# Altium PCB PCB1.PcbDoc
Units mm, origin at the board's own origin, x right, y up, seen from the top; angles counter-clockwise.
Board outline 89 x 74 mm, 2 copper layers (Top Layer, Bottom Layer); 48 components, 43 nets, 273 pads, 366 vias.
Unrouted connection lines stored in the file: 29.
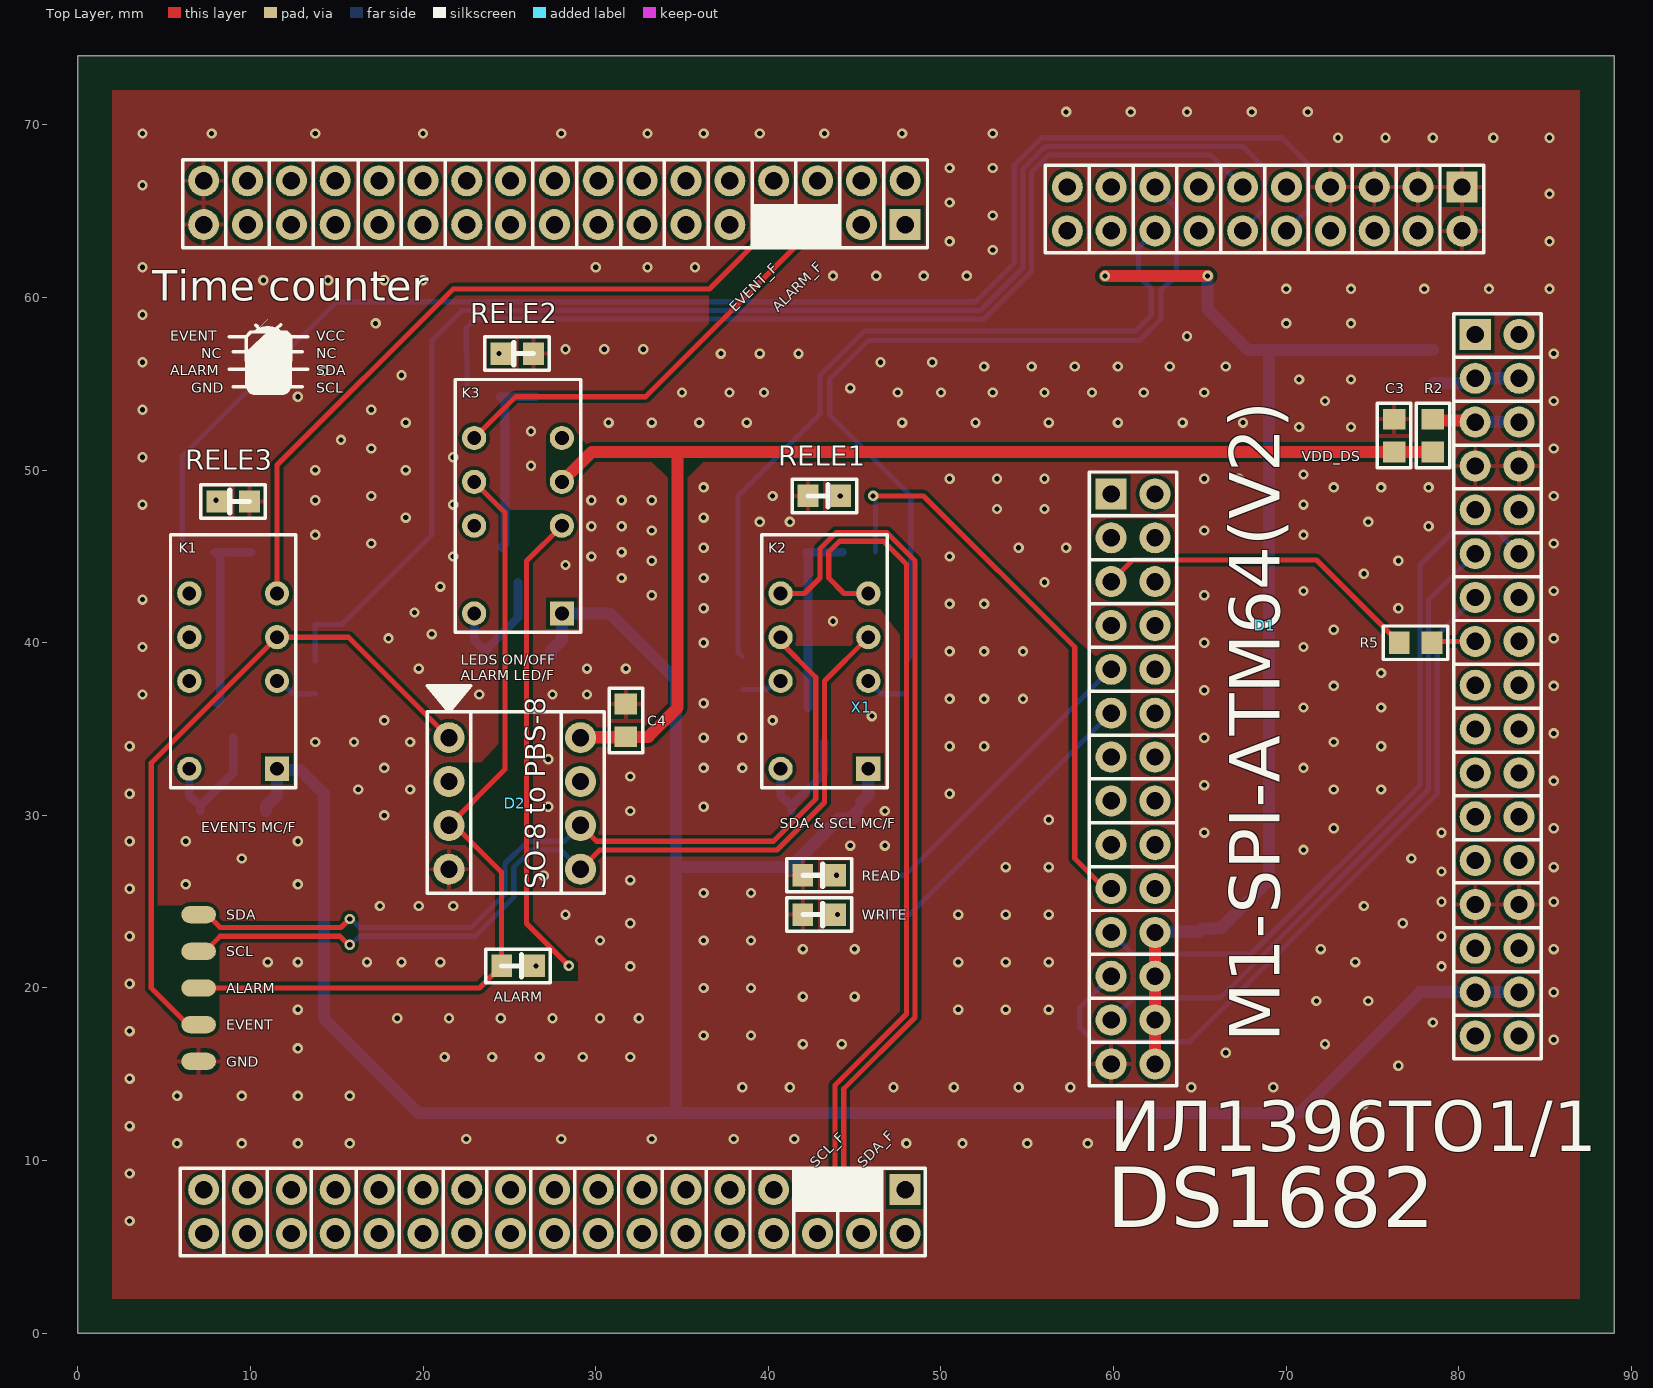
[diagram p0: Top Layer view]
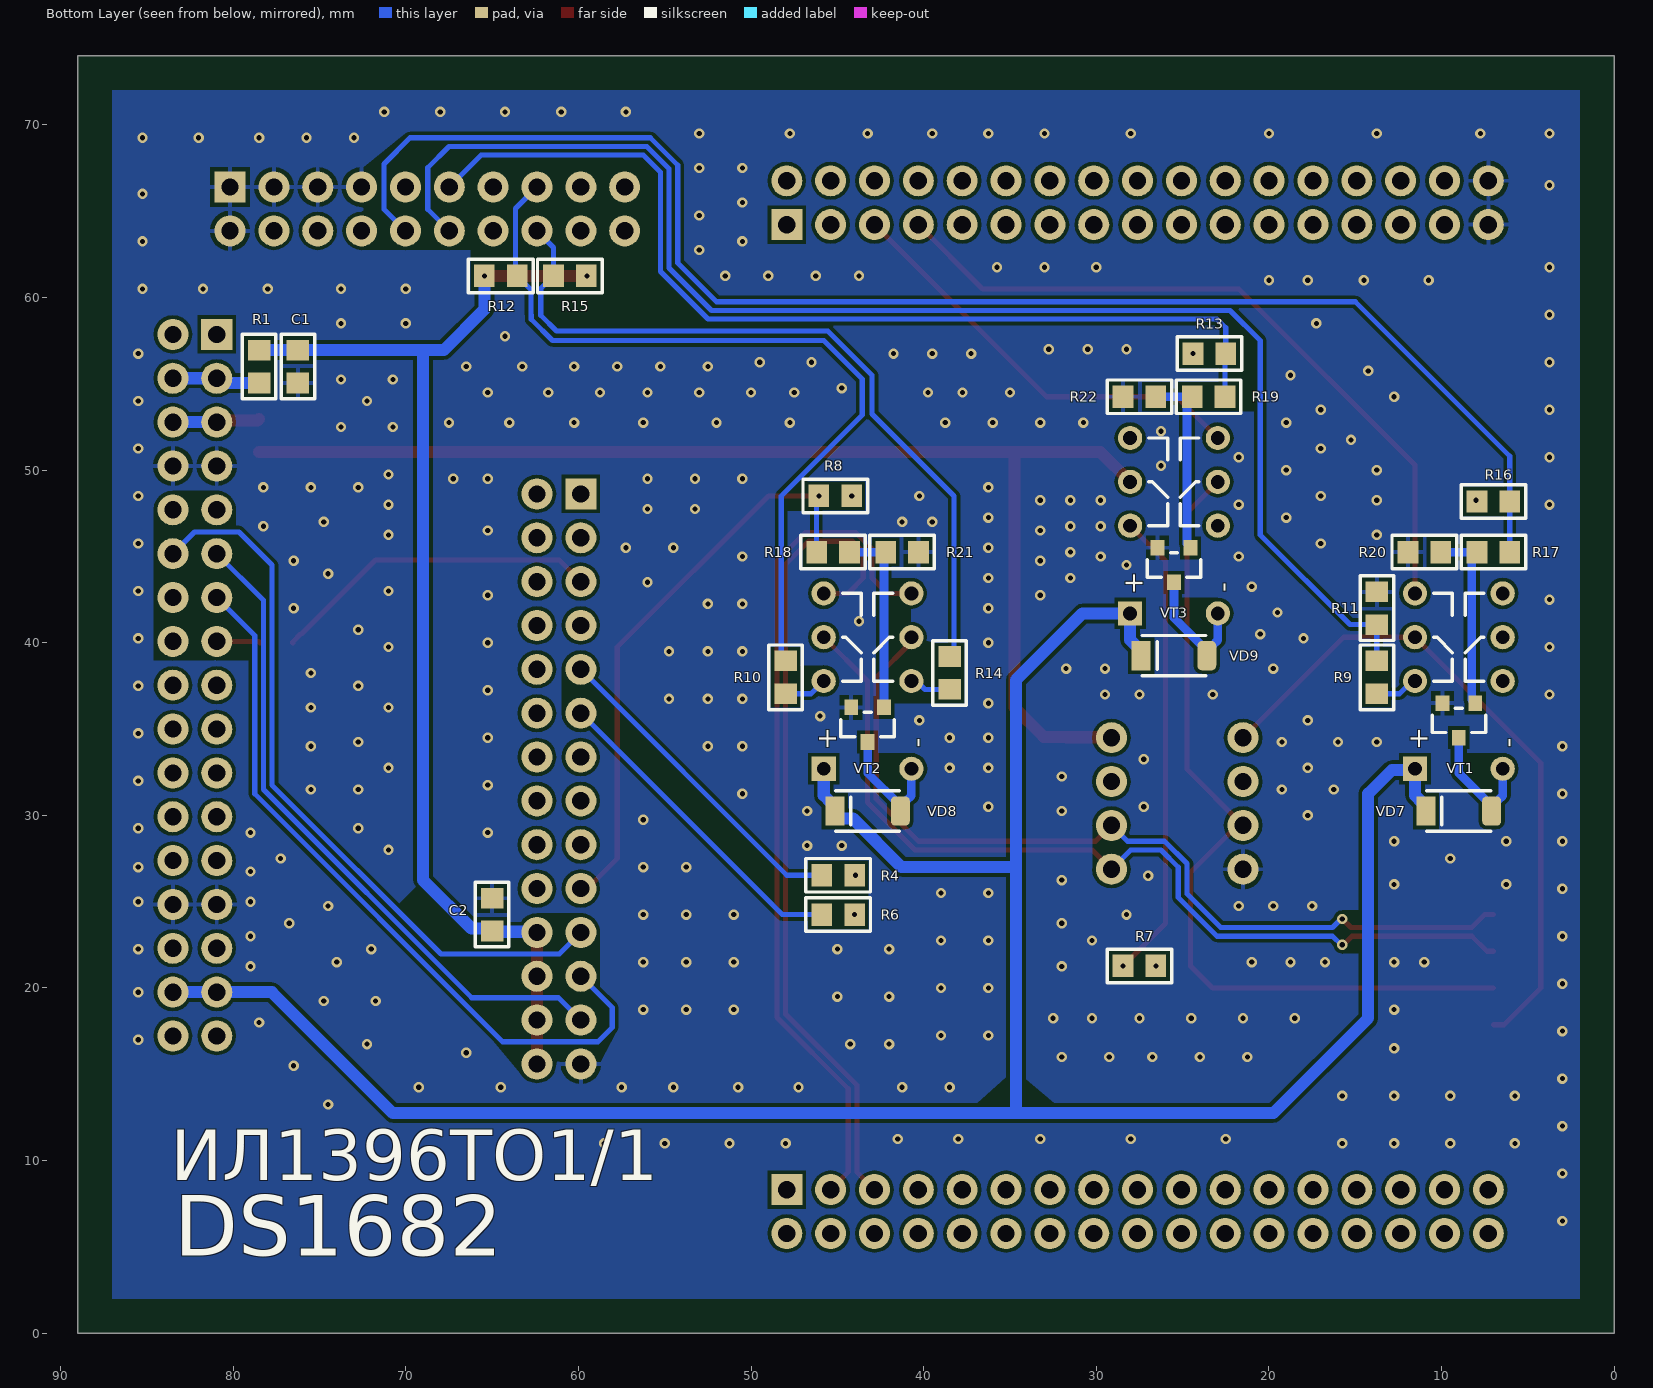
[diagram p1: Bottom Layer view, seen from below]

## Layer stack, top to bottom
Top Solder: solder mask 0.0102, Solder Resist, Dk 3.5
Top Layer: signal copper 0.0356
Dielectric 1: dielectric 0.32, FR-4, Dk 4.8
Bottom Layer: signal copper 0.0356
Bottom Solder: solder mask 0.0102, Solder Resist, Dk 3.5

## Board outline
0,0 89,0 89,74 0,74

## Design rules (kind name [scope] priority, off if disabled: settings)
Clearance [All] p1: gap=0.2 ignorepadtopadclearanceinfootprint=FALSE except(0: Arc-Hole Track-Hole SMDPad-Hole THPad-Hole Via-Hole Fill-Hole Poly-Hole Region-Hole Text-Hole)
ComponentClearance [All] p1: gap=0 collisioncheckmode=3 verticalgap=0 showdistances=FALSE
PolygonConnect [InNet('GND')] p1: thpad.connectstyle=Relief thpad.reliefconductorwidth=0.254 thpad.reliefentries=4 thpad.polygonreliefangle="90 Angle" thpad.airgapwidth=0.254 smdpad.connectstyle=Relief smdpad.reliefconductorwidth=0.254 smdpad.reliefentries=4 smdpad.polygonreliefangle="90 Angle" smdpad.airgapwidth=0.254 via.connectstyle=Direct via.reliefconductorwidth=0.254 via.reliefentries=4 via.polygonreliefangle="90 Angle" via.airgapwidth=0.254
RoutingVias [All] p1: holewidth=0.3 width=0.6 viastyle="Through Hole" minholewidth=0.3 minwidth=0.6 maxholewidth=0.6 maxwidth=1.2
SilkToSilkClearance [All] p1: silktosilkclearance=0
SilkToSolderMaskClearance [IsPad] p1: minsilkscreentomaskgap=0 clearancetoexposedcopper=TRUE
SolderMaskExpansion [All] p1: expansion=0.102 istentingtop=FALSE
Width [All] p1: maxlimit=0.7 minlimit=0.2 preferedwidth=0.3
27 further rules are at their usual default settings.

## Components (designator, comment, footprint, x,y, rotation, side; value= is the part's Value field where it differs from the comment)
ALARM "Contact" Contact 7,20 r180 top (schematic designator KP4)
ALARM "LED(0805)" 0805(LED) 25.5,21.28 r180 top (schematic designator VD3)
C1 "10uF" 0805 76.25,56 r270 bottom
C2 "0.1uF" 0805 65,24.25 r90 bottom
C3 "10uF" 0805 76.25,52 r90 top
C4 "0.1uF" 0805 31.75,35.5 r90 top
D1 "M1-SPI-ATM64(V2)" M1-SPI-ATM64(V2) 68.75,41 r270 top
D2 "DS1682" "SO-8 to PLS-8" 21.5,34.5 r0 top
EVENT "Contact" Contact 7,17.875 r180 top (schematic designator KP2)
GND "Contact" Contact 7,15.75 r180 top (schematic designator KP5)
K1 "V23079A1001B301 TE" V23079A1001B301 9,39 r90 top
K2 "V23079A1001B301 TE" V23079A1001B301 43.25,39 r90 top
K3 "V23079A1001B301 TE" V23079A1001B301 25.5,48 r90 top
R1 "1" 0805 78.5,56 r90 bottom
R2 "1" 0805 78.5,52 r270 top
R4 "2.2k" 0805 44.95,26.532 r180 bottom
R5 "1" 0805 77.5,40 r0 top
R6 "2.2k" 0805 44.95,24.25 r180 bottom
R7 "2.2k" 0805 27.499,21.28 r180 bottom
R8 "2.2k" 0805 45.12,48.506 r180 bottom
R9 "100" 0805 13.75,38 r90 bottom
R10 "100" 0805 48,38 r90 bottom
R11 "10k" 0805 13.75,42 r90 bottom
R12 "10k" 0805 64.5,61.25 r0 bottom
R13 "2.2k" 0805 23.451,56.75 r0 bottom
R14 "100" 0805 38.5,38.25 r90 bottom
R15 "10k" 0805 60.5,61.25 r180 bottom
R16 "2.2k" 0805 7,48.182 r0 bottom
R17 "1k" 0805 7,45.25 r0 bottom
R18 "1k" 0805 45.25,45.25 r180 bottom
R19 "1k" 0805 23.5,54.25 r0 bottom
R20 "20k" 0805 11,45.25 r0 bottom
R21 "20k" 0805 41.25,45.25 r180 bottom
R22 "20k" 0805 27.5,54.25 r0 bottom
READ "LED(0805)" 0805(LED) 42.951,26.532 r180 top (schematic designator VD1)
RELE1 "LED(0805)" 0805(LED) 43.25,48.506 r180 top (schematic designator VD4)
RELE2 "LED(0805)" 0805(LED) 25.45,56.75 r0 top (schematic designator VD5)
RELE3 "LED(0805)" 0805(LED) 9,48.182 r0 top (schematic designator VD6)
SCL "Contact" Contact 7,22.125 r180 top (schematic designator KP1)
SDA "Contact" Contact 7,24.25 r180 top (schematic designator KP3)
VD7 "LL4148 NXP" SOD80C 9,30.25 r0 bottom
VD8 "LL4148 NXP" SOD80C 43.25,30.25 r0 bottom
VD9 "LL4148 NXP" SOD80C 25.5,39.25 r0 bottom
VT1 "MMBT5551L" SOT-23 9,35.5 r0 bottom
VT2 "MMBT5551L" SOT-23 43.25,35.25 r0 bottom
VT3 "MMBT5551L" SOT-23 25.5,44.5 r0 bottom
WRITE "LED(0805)" 0805(LED) 42.951,24.25 r180 top (schematic designator VD2)
X1 "FORMULA" FORMULA 35.75,35 r0 top locked

## Footprints (in the part's own frame and the unit in brackets; to place one, negate y for a bottom-side part, rotate by r counter-clockwise, add the part's x,y. Pads: shape width x height; smd on the part's side, far side on the other; paste and mask are expansions set on the pad)
0805 [mm]
  rect 1.2x1.3 smd: 1(-0.95,0) 2(0.95,0)
  silkscreen extent -1.87,-0.97 1.87,0.97, body extent -1.05,-0.63 0.95,0.63, height 0.55
0805(LED) [mm]
  rect 1.2x1.3 smd: 1(-0.95,0) 2(0.95,0)
  silkscreen extent -1.87,-0.97 1.87,0.97, body extent -1.03,-0.41 1.03,0.5, height 0.85
Contact [mm]
  oval 2x1 smd: 1(0,0)
FORMULA [mm]
  rect 1.8x1.8 hole 1: 1(12.18,29.22) VDDF(12.18,-26.68) VEEF(45.2,22.86)
  round 1.8 hole 1: 2(9.64,29.22) 3(7.1,29.22) 4(4.56,29.22) 5(2.02,29.22) 6(-0.52,29.22) 7(-3.06,29.22) 8(-5.6,29.22) 9(-8.14,29.22) 10(-10.68,29.22) 11(-13.22,29.22) 12(-15.76,29.22) 13(-18.3,29.22) 14(-20.84,29.22) 15(-23.38,29.22) 16(-25.92,29.22) 17(12.18,31.76) 18(9.64,31.76) 19(7.1,31.76) 20(4.56,31.76) 21(2.02,31.76) 22(-0.52,31.76) 23(-3.06,31.76) 24(-5.6,31.76) 25(-8.14,31.76) 26(-10.68,31.76) 27(-13.22,31.76) 28(-15.76,31.76) 29(-18.3,31.76) 30(-20.84,31.76) 31(-23.38,31.76) 32(-25.92,31.76) 33(-28.46,-29.22) 34(-25.92,-29.22) 35(-23.38,-29.22) 36(-20.84,-29.22) 37(-18.3,-29.22) 38(-15.76,-29.22) 39(-13.22,-29.22) 40(-10.68,-29.22) 41(-8.14,-29.22) 42(-5.6,-29.22) 43(-3.06,-29.22) 44(-0.52,-29.22) 45(2.02,-29.22) 46(4.56,-29.22) 47(7.1,-29.22) 48(9.64,-29.22) 49(-28.46,-26.68) 50(-25.92,-26.68) 51(-23.38,-26.68) 52(-20.84,-26.68) 53(-18.3,-26.68) 54(-15.76,-26.68) 55(-13.22,-26.68) 56(-10.68,-26.68) 57(-8.14,-26.68) 58(-5.6,-26.68) 59(-3.06,-26.68) 60(-0.52,-26.68) 61(2.02,-26.68) 62(4.56,-26.68) 63(7.1,-26.68) 64(9.64,-26.68) +5V(45.2,-15.24) +5V(47.74,-15.24) +5V_VCCF(45.2,20.32) +5V_VCCS(47.74,20.32) +5V_VDDF(45.2,17.78) +5V_VDDS(47.74,17.78) +12V(45.2,-12.7) +12V(47.74,-12.7) -12V(45.2,-17.78) -12V(47.74,-17.78) GND(-28.46,29.22) GND(-28.46,31.76) GND(45.2,-10.16) GND(45.2,15.24) GND(47.74,-10.16) GND(47.74,15.24) IN-OUT1(47.74,10.16) IN-OUT2(47.74,7.62) IN-OUT3(47.74,5.08) IN-OUT4(47.74,2.54) IN-OUT5(47.74,0) IN-OUT6(47.74,-2.54) IN-OUT7(47.74,-5.08) IN-OUT8(47.74,-7.62) NC(45.2,12.7) NC(47.74,12.7) OUT1(45.2,10.16) OUT2(45.2,7.62) OUT3(45.2,5.08) OUT4(45.2,2.54) OUT5(45.2,0) OUT6(45.2,-2.54) OUT7(45.2,-5.08) OUT8(45.2,-7.62) VDDS(12.18,-29.22) VEES(47.74,22.86)
  silkscreen extent -29.8,-30.51 49.02,32.97, body extent -29.79,-30.4 48.98,32.92, height 3
M1-SPI-ATM64(V2) [mm]
  rect 1.8x1.8 hole 1: 1X2(-25.4,11.43) 1X3(-7.62,-8.89)
  round 1.8 hole 1: 2X2(-22.86,11.43) 2X3(-7.62,-6.35) 3X2(-25.4,8.89) 3X3(-5.08,-8.89) 4X2(-22.86,8.89) 4X3(-5.08,-6.35) 5X2(-25.4,6.35) 5X3(-2.54,-8.89) 6X2(-22.86,6.35) 6X3(-2.54,-6.35) 7X2(-25.4,3.81) 7X3(0,-8.89) 8X2(-22.86,3.81) 8X3(0,-6.35) 9X2(-25.4,1.27) 9X3(2.54,-8.89) 10X2(-22.86,1.27) 10X3(2.54,-6.35) 11X2(-25.4,-1.27) 11X3(5.08,-8.89) 12X2(-22.86,-1.27) 12X3(5.08,-6.35) 13X2(-25.4,-3.81) 13X3(7.62,-8.89) 14X2(-22.86,-3.81) 14X3(7.62,-6.35) 15X2(-25.4,-6.35) 15X3(10.16,-8.89) 16X2(-22.86,-6.35) 16X3(10.16,-6.35) 17X2(-25.4,-8.89) 17X3(12.7,-8.89) 18X2(-22.86,-8.89) 18X3(12.7,-6.35) 19X2(-25.4,-11.43) 19X3(15.24,-8.89) 20X2(-22.86,-11.43) 20X3(15.24,-6.35) 21X3(17.78,-8.89) 22X3(17.78,-6.35) 23X3(20.32,-8.89) 24X3(20.32,-6.35) 25X3(22.86,-8.89) 26X3(22.86,-6.35) 27X3(25.4,-8.89) 28X3(25.4,-6.35)
  silkscreen extent -26.67,-12.7 26.67,12.7
"SO-8 to PLS-8" [mm]
  round 1.8 hole 1: 1(0,0) 2(0,-2.54) 3(0,-5.08) 4(0,-7.62) 5(7.62,-7.62) 6(7.62,-5.08) 7(7.62,-2.54) 8(7.62,0)
  silkscreen extent -1.25,-9 9,3, body extent -1.28,-9.2 9,1.58, height 8.5
SOD80C [mm]
  rrect50% 1.1x1.7 smd: 1(-1.9,0)
  rect 1.1x1.7 smd: 2(1.9,0)
  silkscreen extent -1.85,-1.17 1.85,1.17, body extent -1.9,-0.8 1.8,0.8, height 1.55
SOT-23 [mm]
  rect 0.8x0.9 smd: 1(-0.95,-1) 1(-0.95,-1) 2(0.95,-1) 2(0.95,-1) 3(0,1) 3(0,1)
  silkscreen extent -1.55,-0.72 1.55,0.7, body extent -1.5,-1.25 1.5,1.25, height 1.05
V23079A1001B301 [mm]
  rect 1.4x1.4 hole 0.8: 1(-6.3,-2.54)
  round 1.4 hole 0.8: 3(-1.22,-2.54) 4(1.32,-2.54) 5(3.86,-2.54) 8(3.86,2.54) 9(1.32,2.54) 10(-1.22,2.54) 12(-6.3,2.54)
  silkscreen extent -7.4,-3.63 7.25,3.63, body extent -7.25,-3.6 7.25,3.6, height 9.4

## Part data
C1 C2 C3 C4: library part C0805, ComponentHeigt=1.3, Firme=AVX, KIND=Конденсатор, Leadform=SMD, Packaging=0805
R1 R2 R4 R5 R6 R7 R8 R9 R10 R11 R12 R13 R14 R15 R16 R17 R18 R19 R20 R21 R22: library part "R0805 Yageo", ComponentHeigt=0.6, Firme=Yageo, KIND=Резистор, Leadform=SMD, Packaging=0805
ALARM READ RELE1 RELE2 RELE3 WRITE: ComponentHeigt=0.75, Firme=Kingbright, KIND="Светодиод L-1154GD Kingbright", Leadform="в отверстия", NN=24003000
D1: ComponentHeigt=5.5, Name=Вилка, Specification="Вилка PLD2-2 *", Typ=PLD2-2
VD7 VD8 VD9: Component Link=http://www.nxp.com, ComponentHeigt=1.6, Firme=NXP, KIND="Диод LL4148 NXP", Leadform=SMD, NN=24009301, Packaging=SOD-80C
VT1 VT2 VT3: ComponentHeigt=1.1, Firme=ONS, KIND="Транзистор MMBT5551L*G ONS", Leadform=SMD, NN=24007468, Packaging=SOT-23

## Via types
v1: diameter 0.6, hole 0.3, Top Layer to Bottom Layer, tented both sides, 366 vias

## Nets (pads, with @x,y where several pads share a name; then routed paths per layer and width w, separated by ;. In a path a pad name is that pad's centre, name@x,y a point inside that pad or via, vN(x,y) a via of type N, cw(c..) or ccw(c..) an arc to the next point about the centre after c; other vN are vias at no path point)
+5V_CONST: K1.1 K2.1 K3.1 VD7.2 VD8.2 VD9.2 X1.+5V | length 143.6
  Bottom Layer w0.7: VD7.2 10.9,30.55 11.1,30.75 11.13,30.75 11.54,31.16 K1.1 11.62,32.62 12.88,32.62 14.25,31.25 14.25,18.25 19.75,12.75 34.66,12.75 ; VD9.2 27.4,39.55 27.6,39.75 27.63,39.75 28.04,40.16 K3.1 30.8,41.7 34.66,37.84 34.66,27 ; VD8.2 44.95,30.05 44.95,29.817 44.098,29.817 41.281,27 34.66,27 ; VD8.2@45.38,30.75 45.79,31.16 K2.1 ; X1.+5V@83.49,19.76 80.95,19.76 77.76,19.76 70.75,12.75 34.66,12.75 ; 34.66,12.75 34.66,19.76 34.66,24.16 34.66,24.5 34.66,27
+5V_VCC: R1.1 X1.+5V_VCCF X1.+5V_VCCS | length 5.1
  Bottom Layer w0.7: R1.1@78.55,55.05 80.382,55.05 80.652,55.32 X1.+5V_VCCS
+5V_VDD: R2.1 X1.+5V_VDDF X1.+5V_VDDS | length 5.1
  Top Layer w0.7: R2.1 78.585,52.865 80.865,52.865 X1.+5V_VDDF
  Bottom Layer w0.7: X1.+5V_VDDF X1.+5V_VDDS
ALARM_DS: ALARM.1@7,20 ALARM.2 D2.3 K3.9 | length 49.7
  Top Layer w0.3: ALARM.1@7,20 23.27,20 ALARM.2 24.55,26.7 21.83,29.42 D2.3 24.75,32.67 24.75,47.53 K3.9
ALARM_F: K3.8 X1.3 | length 25
  Top Layer w0.3: K3.8 25.35,54.25 32.88,54.25 X1.3
DI1_MC: D1.21X3 X1.IN-OUT1 | length 42.3
  Bottom Layer w0.3: D1.21X3 61.11,21.97 67.97,21.97 77.75,31.75 77.75,44.5 79.66,46.41 82.24,46.41 X1.IN-OUT1
DO1_MC: D1.25X3 X1.OUT1 | length 38.7
  Bottom Layer w0.3: D1.25X3 61.15,19.43 66.18,19.43 78.25,31.5 78.25,42.46 X1.OUT1
DO2_MC: D1.23X3 X1.OUT2 | length 43
  Bottom Layer w0.3: D1.23X3 58.045,18.865 58.045,17.705 58.86,16.89 64.39,16.89 78.75,31.25 78.75,40.42 X1.OUT2
EVENT_DS: D2.1 EVENT.1 K1.4 | length 39.3
  Top Layer w0.3: EVENT.1 6.375,17.875 4.25,20 4.25,33.03 K1.4 15.68,40.32 D2.1
EVENT_F: K1.5 X1.4 | length 42
  Top Layer w0.3: K1.5 11.54,50.29 21.75,60.5 36.59,60.5 X1.4
EVENT_MC: D1.12X2 R9.2 R11.1 | length 83.2
  Bottom Layer w0.3: R9.2 R11.1 15.3,41.05 20.5,46.25 20.5,57.5 22.25,59.25 52.293,59.25 54.75,61.707 54.75,67.457 56.043,68.75 67.5,68.75 68.73,67.52 68.73,65.11 D1.12X2
GND: C1.2 C2.2 C3.2 C4.2 D1.1X2 D1.2X2 D1.3X2 D1.5X2 D1.7X2 D1.27X3 D2.4 GND.1 R11.2 R20.2 R21.2 R22.2 READ.2 RELE1.2 RELE2.2 RELE3.2 VT1.2 VT2.2 VT3.2 WRITE.2 X1.GND
  other v1: 3,6.5 3,9.25 5.75,11 9.5,11 12.75,11 15.75,11 48,11 51.25,11 55,11 58.5,11 22.5,11.25 28,11.25 33.25,11.25 38,11.25 41.5,11.25 3,12 74.5,13.25 5.75,13.75 9.5,13.75 12.75,13.75 15.75,13.75 38.5,14.25 41.25,14.25 47.25,14.25 50.75,14.25 54.5,14.25 57.5,14.25 64.5,14.25 69.25,14.25 3,14.75 76.5,15.5 21.25,16 24,16 26.75,16 29.25,16 32,16 66.5,16.25 12.75,16.5 42,16.75 44.25,16.75 72.25,16.75 85.5,17 36.25,17.25 39,17.25 3,17.5 78.5,18 18.5,18.25 21.5,18.25 24.5,18.25 27.5,18.25 30.25,18.25 32.5,18.25 12.75,18.75 51,18.75 53.75,18.75 56.25,18.75 71.75,19.25 74.75,19.25 42,19.5 45,19.5 85.5,19.75 36.25,20 39,20 3,20.25 32,21.25 79,21.25 11,21.5 12.75,21.5 16.75,21.5 18.75,21.5 21,21.5 51,21.5 53.75,21.5 56.25,21.5 74,21.5 42,22.25 45,22.25 72,22.25 85.5,22.25 30.25,22.75 36.25,22.75 39,22.75 3,23 79,23 32,23.75 76.75,23.75 28.25,24.25 51,24.25 53.75,24.25 56.25,24.25 17.5,24.75 19.75,24.75 21.75,24.75 74.5,24.75 79,25 85.5,25 36.25,25.5 39,25.5 3,25.75 6.25,26 12.75,26 32,26.25 27,26.5 79,26.75 53.75,27 56.25,27 85.5,27 9.5,27.5 77.25,27.5 71,28 44.75,28.25 46.75,28.25 3,28.5 6.25,28.5 12.75,28.5 65.25,29 79,29 72.75,29.25 85.5,29.25 56.25,29.75 17.75,30 32,30.25 46.75,30.25 27.25,30.5 36.25,30.5 3,31.25 50.5,31.25 16.25,31.5 19.25,31.5 72.75,31.5 75.5,31.5 65.25,31.75 85.5,32 32,32.25 17.75,32.75 36.25,32.75 38.5,32.75 71,32.75 27.25,33.25 3,34 50.5,34 52.5,34 75.5,34 13.75,34.25 16,34.25 19.25,34.25 72.75,34.25 36.25,34.5 38.5,34.5 65.25,34.5 85.5,34.75 17.75,35.5 40.25,35.5 46,35.75 71,36.25 75.5,36.25 36.25,36.5 50.5,36.75 52.5,36.75 54.75,36.75 3.75,37 23.25,37 27.5,37 29.5,37 65.25,37.25 72.75,37.5 85.5,37.5 75.5,38.25 19.75,38.5 29.5,38.5 31.75,38.5 50.5,39.5 52.5,39.5 54.75,39.5 3.75,39.75 71,39.75 36.25,40 65.25,40 18,40.25 85.5,40.25 20.5,40.5 72.75,40.75 43.75,41.25 19.5,41.75 36.25,42 76.5,42 50.5,42.25 52.5,42.25 3.75,42.5 33.25,42.75 65.25,42.75 71,43 85.5,43 21,43.25 56,43.5 31.5,43.75 36.25,43.75 74.5,44 28.25,44.5 33.25,44.75 76.5,44.75 21.75,45 29.75,45 50.5,45 31.5,45.25 36.25,45.5 54.5,45.5 57.25,45.5 17,45.75 85.5,45.75 13.75,46.25 71,46.25 33.25,46.5 65.25,46.5 29.75,46.75 31.5,46.75 78.25,46.75 39.5,47 41.25,47 74.75,47 19,47.25 36.25,47.25 53.25,47.75 56,47.75 3.75,48 21.75,48 71,48 13.75,48.25 29.75,48.25 31.5,48.25 33.25,48.25 17,48.5 40.25,48.5 85.5,48.5 36.25,49 72.75,49 75.5,49 78.25,49 50.5,49.5 53.25,49.5 56,49.5 65.25,49.5 67.25,49.5 71,49.75 13.75,50 19,50 26.25,50.25 3.75,50.75 21.75,50.75 17,51.25 85.5,51.25 15.25,51.75 26.25,52.25 70.75,52.5 73.75,52.5 19,52.75 30.75,52.75 33.25,52.75 36,52.75 38.75,52.75 47.75,52.75 52,52.75 56.25,52.75 60.25,52.75 64,52.75 67.5,52.75 3.75,53.5 17,53.5 72.25,54 85.5,54 12.75,54.25 35,54.5 37.75,54.5 39.75,54.5 47.5,54.5 50,54.5 53,54.5 56,54.5 58.75,54.5 61.75,54.5 65.25,54.5 44.75,54.75 70.75,55.25 73.75,55.25 18.75,55.5 14.25,55.75 52.5,56 55.25,56 57.75,56 60.25,56 63.25,56 66.5,56 3.75,56.25 46.5,56.25 49.5,56.25 37.25,56.75 39.5,56.75 41.75,56.75 85.5,56.75 28.25,57 30.5,57 32.75,57 64.25,57.75 17.25,58.5 70,58.5 73.75,58.5 3.75,59 70,60.5 73.75,60.5 78,60.5 81.75,60.5 85.25,60.5 10.75,61 14.5,61 17.75,61 20,61 43.75,61.25 46.25,61.25 49,61.25 51.5,61.25 3.75,61.75 30,61.75 33,61.75 35.75,61.75 53,62.75 50.5,63.25 85.25,63.25 53,64.75 50.5,65.5 85.25,66 3.75,66.5 50.5,67.5 53,67.5 73,69.25 75.75,69.25 78.5,69.25 82,69.25 85.25,69.25 3.75,69.5 7.75,69.5 13.75,69.5 20,69.5 28,69.5 33,69.5 36.25,69.5 39.5,69.5 43.25,69.5 47.75,69.5 53,69.5 57.25,70.75 61,70.75 64.25,70.75 68,70.75 71.25,70.75
LED_READ: D1.9X3 R4.1 | length 18.9
  Bottom Layer w0.3: R4.1 47.932,26.532 D1.9X3
LED_WRITE: D1.11X3 R6.1 | length 18.8
  Bottom Layer w0.3: R6.1 48.19,24.25 D1.11X3
NetK1_3: K1.3 R9.1 | length 2.5
  Bottom Layer w0.3: K1.3 11.706,37.78 12.436,37.05 R9.1
NetK1_12: K1.12 VD7.1 VT1.3 | length 7.5
  Bottom Layer w0.5: K1.12 6.46,31.143 6.768,30.835 6.802,30.835 7.1,30.536 VD7.1 ; VD7.1@7.1,30.55 9,32.45 VT1.3@9,34.5
NetK2_3: K2.3 R10.1 | length 2.5
  Bottom Layer w0.3: K2.3 46.52,37.05 R10.1
NetK2_10: K2.10 R14.1 | length 2.4
  Bottom Layer w0.3: R14.1 39.932,37.3 40.412,37.78 K2.10
NetK2_12: K2.12 VD8.1 VT2.3 | length 7.2
  Bottom Layer w0.5: K2.12 40.71,31.143 41.018,30.835 41.052,30.835 41.35,30.536 VD8.1 ; VD8.1@41.35,30.55 43.25,32.45 VT2.3@43.25,34.25
NetK3_12: K3.12 VD9.1 VT3.3 | length 7.5
  Bottom Layer w0.5: K3.12 22.96,40.143 23.268,39.835 23.302,39.835 23.6,39.536 VD9.1 ; VD9.1@23.6,39.55 25.5,41.45 VT3.3@25.5,43.5
NetR4_2: R4.2 READ.1 | length 0.1
  Bottom Layer w0.3: v1(43.95,26.532) R4.2
NetR6_2: R6.2 WRITE.1
  other v1: 44,24.25
NetR7_2: ALARM.1@26.45,21.28 R7.2
  other v1: 26.549,21.28
NetR8_2: R8.2 RELE1.1
  other v1: 44.17,48.506
NetR13_2: R13.2 RELE2.1
  other v1: 24.401,56.75
NetR16_2: R16.2 RELE3.1 | length 0.1
  Bottom Layer w0.3: R16.2 7.95,48.2 v1(8,48.25)
NetR17_2: R17.2 R20.1 VT1.1 | length 11.1
  Bottom Layer w0.5: VT1.1@8.05,36.5 8.25,36.7 8.25,44.95 R17.2 R20.1
NetR18_2: R18.2 R21.1 VT2.1 | length 11.1
  Bottom Layer w0.5: VT2.1@42.3,36.25 42.3,45.15 R21.1 R18.2
NetR19_2: R19.2 R22.1 VT3.1 | length 11.1
  Bottom Layer w0.5: VT3.1@24.55,45.5 24.55,45.55 24.75,45.75 24.75,53.95 R19.2 R22.1
RELE1: D1.19X3 R8.1 R18.1 | length 33.7
  Top Layer w0.3: v1(46.07,48.506) 48.994,48.506 57.75,39.75 57.75,27.5 59.49,25.76 D1.19X3
  Bottom Layer w0.3: v1(46.07,48.506) 46.2,48.376 R18.1
RELE2: D1.11X2 R13.1 R19.1 | length 57.3
  Bottom Layer w0.3: R19.1 22.55,56.701 R13.1 22.501,58.251 23,58.75 52.5,58.75 55.25,61.5 55.25,67.25 56.25,68.25 65.63,68.25 D1.11X2
RELE3: D1.10X2 R16.1 R17.1 | length 86.7
  Bottom Layer w0.3: R17.1 R16.1 6.05,50.8 15,59.75 52,59.75 54.25,62 54.25,67.664 55.836,69.25 69.75,69.25 71.27,67.73 71.27,65.11 D1.10X2
RST_IN: R5.2 X1.OUT3 | length 2.5
  Top Layer w0.3: R5.2 78.53,40.08 X1.OUT3
RST_MC: D1.5X3 R5.1 | length 19.2
  Top Layer w0.3: D1.5X3 61.11,44.79 71.76,44.79 76.05,40.5 76.1,40.5 76.55,40.05 R5.1
SCL_DS: D2.5 K2.4 SCL.1 | length 52.8
  Top Layer w0.3: SCL.1 7.375,22.125 8.25,23 15.189,23 15.689,22.5 v1(15.75,22.5) ; D2.5 30.24,28 40.5,28 43.25,30.75 43.25,37.78 K2.4
  Bottom Layer w0.3: v1(15.75,22.5) 15.811,22.5 16.311,23 23,23 25.25,25.25 25.25,27 26.25,28 28,28 D2.5
SCL_F: K2.5 X1.63 | length 47.8
  Top Layer w0.3: X1.63 43.872,9.342 43.872,14.372 48,18.5 48,44.543 46.667,45.876 44.126,45.876 43.5,45.25 43.5,43.75 44.39,42.86 K2.5
SCL_MC: D1.15X2 R10.2 R12.1 | length 47.6
  Bottom Layer w0.3: R10.2 48.25,39.2 48.25,48.5 43.554,53.196 43.554,55.271 45.783,57.5 61.5,57.5 62.738,58.738 62.738,58.988 62.75,59 62.75,60.45 63.05,60.75 63.1,60.75 63.55,61.2 R12.1 63.65,61.35 63.65,65.15 D1.15X2
SDA_DS: D2.6 K2.9 SDA.1 | length 51.6
  Top Layer w0.3: SDA.1 7.5,24.25 8.25,23.5 15.25,23.5 v1(15.75,24) ; D2.6 30.04,28.5 40.293,28.5 42.75,30.957 42.75,38 40.71,40.04 K2.9
  Bottom Layer w0.3: v1(15.75,24) 15.826,24 16.326,23.5 22.793,23.5 24.75,25.457 24.75,27.207 26.043,28.5 28.2,28.5 D2.6
SDA_F: K2.8 X1.64 | length 49.5
  Top Layer w0.3: K2.8 42.1,42.86 42.99,43.75 42.99,45.447 43.919,46.376 46.874,46.376 48.5,44.75 48.5,18.293 44.372,14.165 44.372,9.338 X1.64
SDA_MC: D1.16X2 R14.2 R15.1 | length 44.6
  Bottom Layer w0.3: R14.2 38.25,39.45 38.25,48.5 43,53.25 43,55.5 45.554,58.054 61.271,58.054 62.184,58.967 62.184,60.516 61.95,60.75 61.9,60.75 61.45,61.2 R15.1 61.45,62.901 62.4,63.851 D1.16X2
VCC_DS: C3.1 C4.1 D2.8 K3.4 R2.2 | length 72.3
  Top Layer w0.7: K3.4 29.77,51.05 34.75,51.05 ; D2.8 29.145,34.525 31.725,34.525 C4.1 33.05,34.55 34.75,36.25 34.75,51.05 ; R2.2 C3.1 34.75,51.05
VCC_MC: C1.1 C2.1 D1.22X3 D1.24X3 D1.26X3 D1.28X3 R1.2 R12.2 R15.2 | length 68.1
  Top Layer w0.7: v1(59.5,61.25) v1(65.45,61.25) ; D1.28X3 D1.26X3 D1.24X3 D1.22X3
  Bottom Layer w0.7: D1.22X3 62.44,23.26 64.96,23.26 65.142,23.442 66.192,23.442 69,26.25 69,56.95 ; R12.2@65.45,61.2 v1(65.45,61.25) 65.45,59.3 67.8,56.95 69,56.95 ; R1.2 C1.1 69,56.95
VDD: K3.3 R7.1 | length 27.4
  Top Layer w0.3: K3.3 26,44.74 26,23.729 v1(28.449,21.28)
pads on no net: D1.1X3 D1.2X3 D1.3X3 D1.4X2 D1.4X3 D1.6X2 D1.6X3 D1.7X3 D1.8X2 D1.8X3 D1.9X2 D1.10X3 D1.12X3 D1.13X2 D1.13X3 D1.14X2 D1.14X3 D1.15X3 D1.16X3 D1.17X2 D1.17X3 D1.18X2 D1.18X3 D1.19X2 D1.20X2 D1.20X3 D2.2 D2.7 K1.8 K1.9 K1.10 K3.5 K3.10 X1.1 X1.2 X1.5 X1.6 X1.7 X1.8 X1.9 X1.10 X1.11 X1.12 X1.13 X1.14 X1.15 X1.16 X1.17 X1.18 X1.19 X1.20 X1.21 X1.22 X1.23 X1.24 X1.25 X1.26 X1.27 X1.28 X1.29 X1.30 X1.31 X1.32 X1.33 X1.34 X1.35 X1.36 X1.37 X1.38 X1.39 X1.40 X1.41 X1.42 X1.43 X1.44 X1.45 X1.46 X1.47 X1.48 X1.49 X1.50 X1.51 X1.52 X1.53 X1.54 X1.55 X1.56 X1.57 X1.58 X1.59 X1.60 X1.61 X1.62 X1.+12V X1.-12V X1.IN-OUT2 X1.IN-OUT3 X1.IN-OUT4 X1.IN-OUT5 X1.IN-OUT6 X1.IN-OUT7 X1.IN-OUT8 X1.NC X1.OUT4 X1.OUT5 X1.OUT6 X1.OUT7 X1.OUT8 X1.VDDF X1.VDDS X1.VEEF X1.VEES

## Polygon pours and split planes (outlines as drawn)
GND on Top Layer "NONET_L-01_P-001" (solid, remove dead copper, pour order 0): 2,72 2,2 87,2 87,72
GND on Bottom Layer "NONET_L-01_P-001" (solid, remove dead copper, pour order 1): 2,72 2,2 87,2 87,72

## Other copper
Top Layer:
  pour cut-out: 21.5,28.311 23,28.311 23,28.75
  pour cut-out: 34.75,49 34.75,51 36.75,51
  pour cut-out: 32.75,51 34.75,51 34.75,49
  pour cut-out: 23.197,32.865 24.5,32.865 24.5,34.25
  pour cut-out: 41.451,39.804 45.672,39.804 45.672,39.42
  pour cut-out: 41.543,42.503 45.75,42.503 45.75,44
  pour cut-out: 48,40 48,42.86 45.79,42.86
  pour cut-out: 60.96,38.605 60.96,28.3 59.86,28.3
  pour cut-out: 58.002,40.002 58.002,38.46 59.86,38.46
  pour cut-out: 77.65,52.15 79.35,52.15 79.35,51.85 77.65,51.85
  pour cut-out: 77.35,40.85 77.65,40.85 77.65,39.15 77.35,39.15
  pour cut-out: 16.25,24.099 16.25,22.5 15.75,22.5
  pour cut-out: 21.645,33.06 24.75,33.06 24.75,32.67
  pour cut-out: 20.4,31.815 20.4,29.42 21.5,29.42
  pour cut-out: 28.095,28.995 28.095,26.88 29.12,26.88
  pour cut-out: 45.908,41.96 48,41.96 48,43.25
  pour cut-out: 59.715,42.44 62.4,42.44 62.4,43.54
  pour cut-out: 63.5,46.225 63.5,43.54 62.4,43.54
  pour cut-out: 60.005,47.18 62.4,47.18 62.4,46.08
  pour cut-out: 58.76,43.685 58.76,46.08 59.86,46.08
  pour cut-out: 60.005,29.4 57.75,29.4 57.75,28.5
  pour cut-out: 60.96,28.445 60.96,25.76 59.86,25.76
  pour cut-out: 58.76,28.445 58.76,25.76 59.86,25.76
  pour cut-out: 63.5,23.365 63.5,15.6 62.4,15.6
  pour cut-out: 61.3,23.365 61.3,15.6 62.4,15.6
  pour cut-out: 42.705,7.22 45.39,7.22 45.39,8.32
  pour cut-out: 7,24.75 4.25,24.75 4.25,23.25
  pour cut-out: 8.206,20 8.206,24.25 7,24.25
  pour cut-out: 8.206,17.875 8.206,20 7,20
  pour cut-out: 5.794,24.25 5.794,20 7,20
  pour cut-out: 27.011,20.43 28.949,20.43 28.949,21.512
  pour cut-out: 25.35,20.43 25.35,22.13 25.65,22.13 25.65,20.43
  pour cut-out: 28.158,47.68 24.75,47.68 24.75,46.75
  pour cut-out: 28.879,52.207 28.879,51.05 29.77,51.05
  pour cut-out: 27.14,51.978 27.14,49.32 28.04,49.32
  pour cut-out: 36.59,60.5 36.59,58.25 37,58.25
  pour cut-out: 40.455,65.32 42.85,65.32 42.85,64.22
Bottom Layer:
  pour cut-out: 39.007,39.919 40.71,39.919 40.71,40.32
  pour cut-out: 38.395,36.5 42.25,36.5 42.25,38.946
  pour cut-out: 63.075,14.72 63.075,17 65,17
  pour cut-out: 60.526,15.752 62.4,15.752 62.4,18.981
  pour cut-out: 57.689,17.705 58.706,17.705 58.706,15.752
  pour cut-out: 59.715,24.32 62.4,24.32 62.4,23.22
  pour cut-out: 58.76,23.365 58.76,18.14 59.86,18.14
  pour cut-out: 69,26.25 69,24.5 70.75,24.5
  pour cut-out: 34.75,15.25 34.75,12.75 37.5,12.75
  pour cut-out: 31.75,12.75 34.75,12.75 34.75,15.25
  pour cut-out: 66.25,62.1 66.25,63.86 64.94,63.86
  pour cut-out: 72.431,67.554 70.002,67.554 70.002,69.502
  pour cut-out: 72.408,65.246 72.408,63.86 70.02,63.86
  pour cut-out: 65.085,62.76 72.56,62.76 72.56,63.86
  pour cut-out: 65.085,62.76 62.4,62.76 62.4,63.851
  pour cut-out: 61.3,66.545 61.3,63.851 62.4,63.851
  pour cut-out: 64.35,60.4 64.35,62.1 64.65,62.1 64.65,60.4
  pour cut-out: 60.35,60.4 60.35,62.1 60.65,62.1 60.65,60.4
  pour cut-out: 77.65,56.15 77.65,55.85 79.35,55.85 79.35,56.15
  pour cut-out: 81.095,38.98 84.59,38.98 84.59,42.62
  pour cut-out: 84.59,45.16 84.59,42.62 83.49,42.62
  pour cut-out: 83.635,41.52 80.95,41.52 80.95,42.62
  pour cut-out: 81.095,38.98 79,38.98 79,41.183
  pour cut-out: 80.95,40.08 79.25,40.08 79.25,40.92
  pour cut-out: 82.05,42.765 82.05,40.08 80.95,40.08
  pour cut-out: 84.59,47.845 84.59,45.16 83.49,45.16
  pour cut-out: 80.805,48.8 83.49,48.8 83.49,47.7
  pour cut-out: 79.85,47.845 79.85,46.41 80.95,46.41
  pour cut-out: 43.2,26.485 43.2,24.25 44.448,24.25
  pour cut-out: 60.96,38.605 60.96,35.92 59.86,35.92
  pour cut-out: 40.71,38.68 38.5,38.68 38.5,37.3
  pour cut-out: 45.908,38.68 48,38.68 48,37.05
  pour cut-out: 40.71,42.86 40.71,37.44 42.25,37.44
  pour cut-out: 40.828,36.88 42.25,36.88 42.25,38
  pour cut-out: 40.828,38.68 42.25,38.68 42.25,38
  pour cut-out: 40.828,39.42 42.25,39.42 42.25,40.5
  pour cut-out: 40.828,41.22 42.25,41.22 42.25,40.5
  pour cut-out: 40.592,41.96 42.25,41.96 42.25,43.255
  pour cut-out: 40.592,43.76 42.25,43.76 42.25,42.75
  pour cut-out: 46.279,47.656 48.25,47.656 48.25,48.862
  pour cut-out: 45.1,44.4 45.1,46.1 45.4,46.1 45.4,44.4
  pour cut-out: 44.97,49.356 44.97,47.656 45.27,47.656 45.27,49.356
  pour cut-out: 47.15,38.15 47.15,37.85 48.85,37.85 48.85,38.15
  pour cut-out: 37.65,38.4 37.65,38.1 39.35,38.1 39.35,38.4
  pour cut-out: 40.592,33.6 43.25,33.6 43.25,32.45
  pour cut-out: 44.8,25.1 45.1,25.1 45.1,23.4 44.8,23.4
  pour cut-out: 44.8,27.382 45.1,27.382 45.1,25.682 44.8,25.682
  pour cut-out: 30.22,29.565 30.22,26.88 29.12,26.88
  pour cut-out: 27.349,22.13 27.349,20.43 27.649,20.43 27.649,22.13
  pour cut-out: 15.651,22 14.25,22 14.25,23.25
  pour cut-out: 15.651,24.5 14.25,24.5 14.25,23.75
  pour cut-out: 6.342,33.6 9,33.6 9,32.45
  pour cut-out: 6.85,49.032 6.85,47.332 7.15,47.332 7.15,49.032
  pour cut-out: 6.85,46.1 6.85,44.4 7.15,44.4 7.15,46.1
  pour cut-out: 12.9,38.15 12.9,37.85 14.6,37.85 14.6,38.15
  pour cut-out: 23.078,42.6 25.5,42.6 25.5,41.45
  pour cut-out: 23.301,57.6 23.301,55.9 23.601,55.9 23.601,57.6
  pour cut-out: 23.35,55.1 23.35,53.4 23.65,53.4 23.65,55.1
  pour cut-out: 21.932,53.4 20.5,53.4 20.5,54.66

## Silkscreen, mask and mechanical layers (free items; w line width, h text height)
Top Overlay:
  rectangle: 39.06,62.89 44.14,65.43
  rectangle: 41.48,7.03 46.56,9.57
  region: 10.25,58 cw(c10.854,57.396) 10.854,58.25 11.146,58.25 cw(c11.146,57.396) 11.75,58
  region: 9.76,56.85 11.037,58.034 12.037,58.034 12.332,57.739 12.332,54.834 cw(c11.866,54.834) 11.866,54.367 10.228,54.367 cw(c10.228,54.822) 9.773,54.819
  region: 10.25,58 11,58.75
  lines w0.2: 8.76,55.834 9.76,55.834 ; 8.76,57.739 9.76,57.739 9.774,54.818 ; 9.012,54.818 9.76,54.818 ; 9.012,56.85 9.76,56.85 ; 9.723,57.705 10,58 12.071,58 12.332,57.739 ; 10.25,58 cw(c11,57) 11.75,58 ; 10.32,58.393 10.516,58.197 ; 11.535,58.208 11.749,58.422 ; 12.318,54.818 12.332,57.739 ; 12.332,54.818 13.012,54.818 ; 12.332,55.834 13.332,55.834 ; 12.332,56.85 13.012,56.85 ; 13.332,57.739 12.332,57.739
  text "Time counter" at 4.315,59.233 h3
  text "EVENT_F" at 38.084,59.127 h0.6 r45
  text "ALARM_F" at 40.584,59.127 h0.6 r45
  text "VCC" at 13.801,57.488 h0.6
  text "EVENT" at 5.36,57.484 h0.6
  text "NC" at 7.16,56.484 h0.6
  text "NC" at 13.801,56.488 h0.6
  text "ALARM" at 5.36,55.484 h0.6
  text "SDA" at 13.801,55.488 h0.6
  text "GND" at 6.56,54.484 h0.6
  text "SCL" at 13.801,54.488 h0.6
  text "VDD_DS" at 70.901,50.5 h0.6
  text "LEDS ON/OFF / ALARM LED/F" at 22.176,37.831 h0.6
  text "SDA & SCL MC/F" at 40.651,29.26 h0.6
  text "EVENTS MC/F" at 7.151,29.01 h0.6
  text "M1-SPI-ATM64(V2)" at 70.587,16.86 h5 r90
  text "ИЛ1396ТО1/1" at 59.791,9.598 h5
  text "SCL_F" at 42.758,9.551 h0.6 r45
  text "SDA_F" at 45.508,9.551 h0.6 r45
  text "DS1682" at 59.593,4.995 h6
Bottom Overlay:
  text "ИЛ1396ТО1/1" at 83.616,7.919 h5
  text "DS1682" at 83.418,3.317 h6
Board:
  the board outline again, w0.2

## Dimensions
89,74 to 89,0 on Mechanical 1
0,0 to 89,0 on Mechanical 1

## Text inside footprints (layer, text, board x,y; h text height)
D2: Top Overlay "SO-8 to PBS-8" at 27.488,25.709 h2 r90
K1: Bottom Overlay "-" at 6.89,33.93 h2 r90; Bottom Overlay "+" at 12.2,33.78 h2 r90
K2: Bottom Overlay "-" at 41.14,33.93 h2 r90; Bottom Overlay "+" at 46.45,33.78 h2 r90
K3: Bottom Overlay "-" at 23.39,42.93 h2 r90; Bottom Overlay "+" at 28.7,42.78 h2 r90